# Altium PCB Industrial_IOT_Dev_Brd-v1.0.PcbDoc (part 7 of 8)
Units mil, origin at the board's own origin, x right, y up, seen from the top; angles counter-clockwise.
Board outline 6299.21 x 4724.41 mil, 4 copper layers (Top Layer, Layer 1, Layer 2, Bottom Layer), stack 62.047 mil thick; 376 components, 240 nets, 1129 pads, 635 vias.
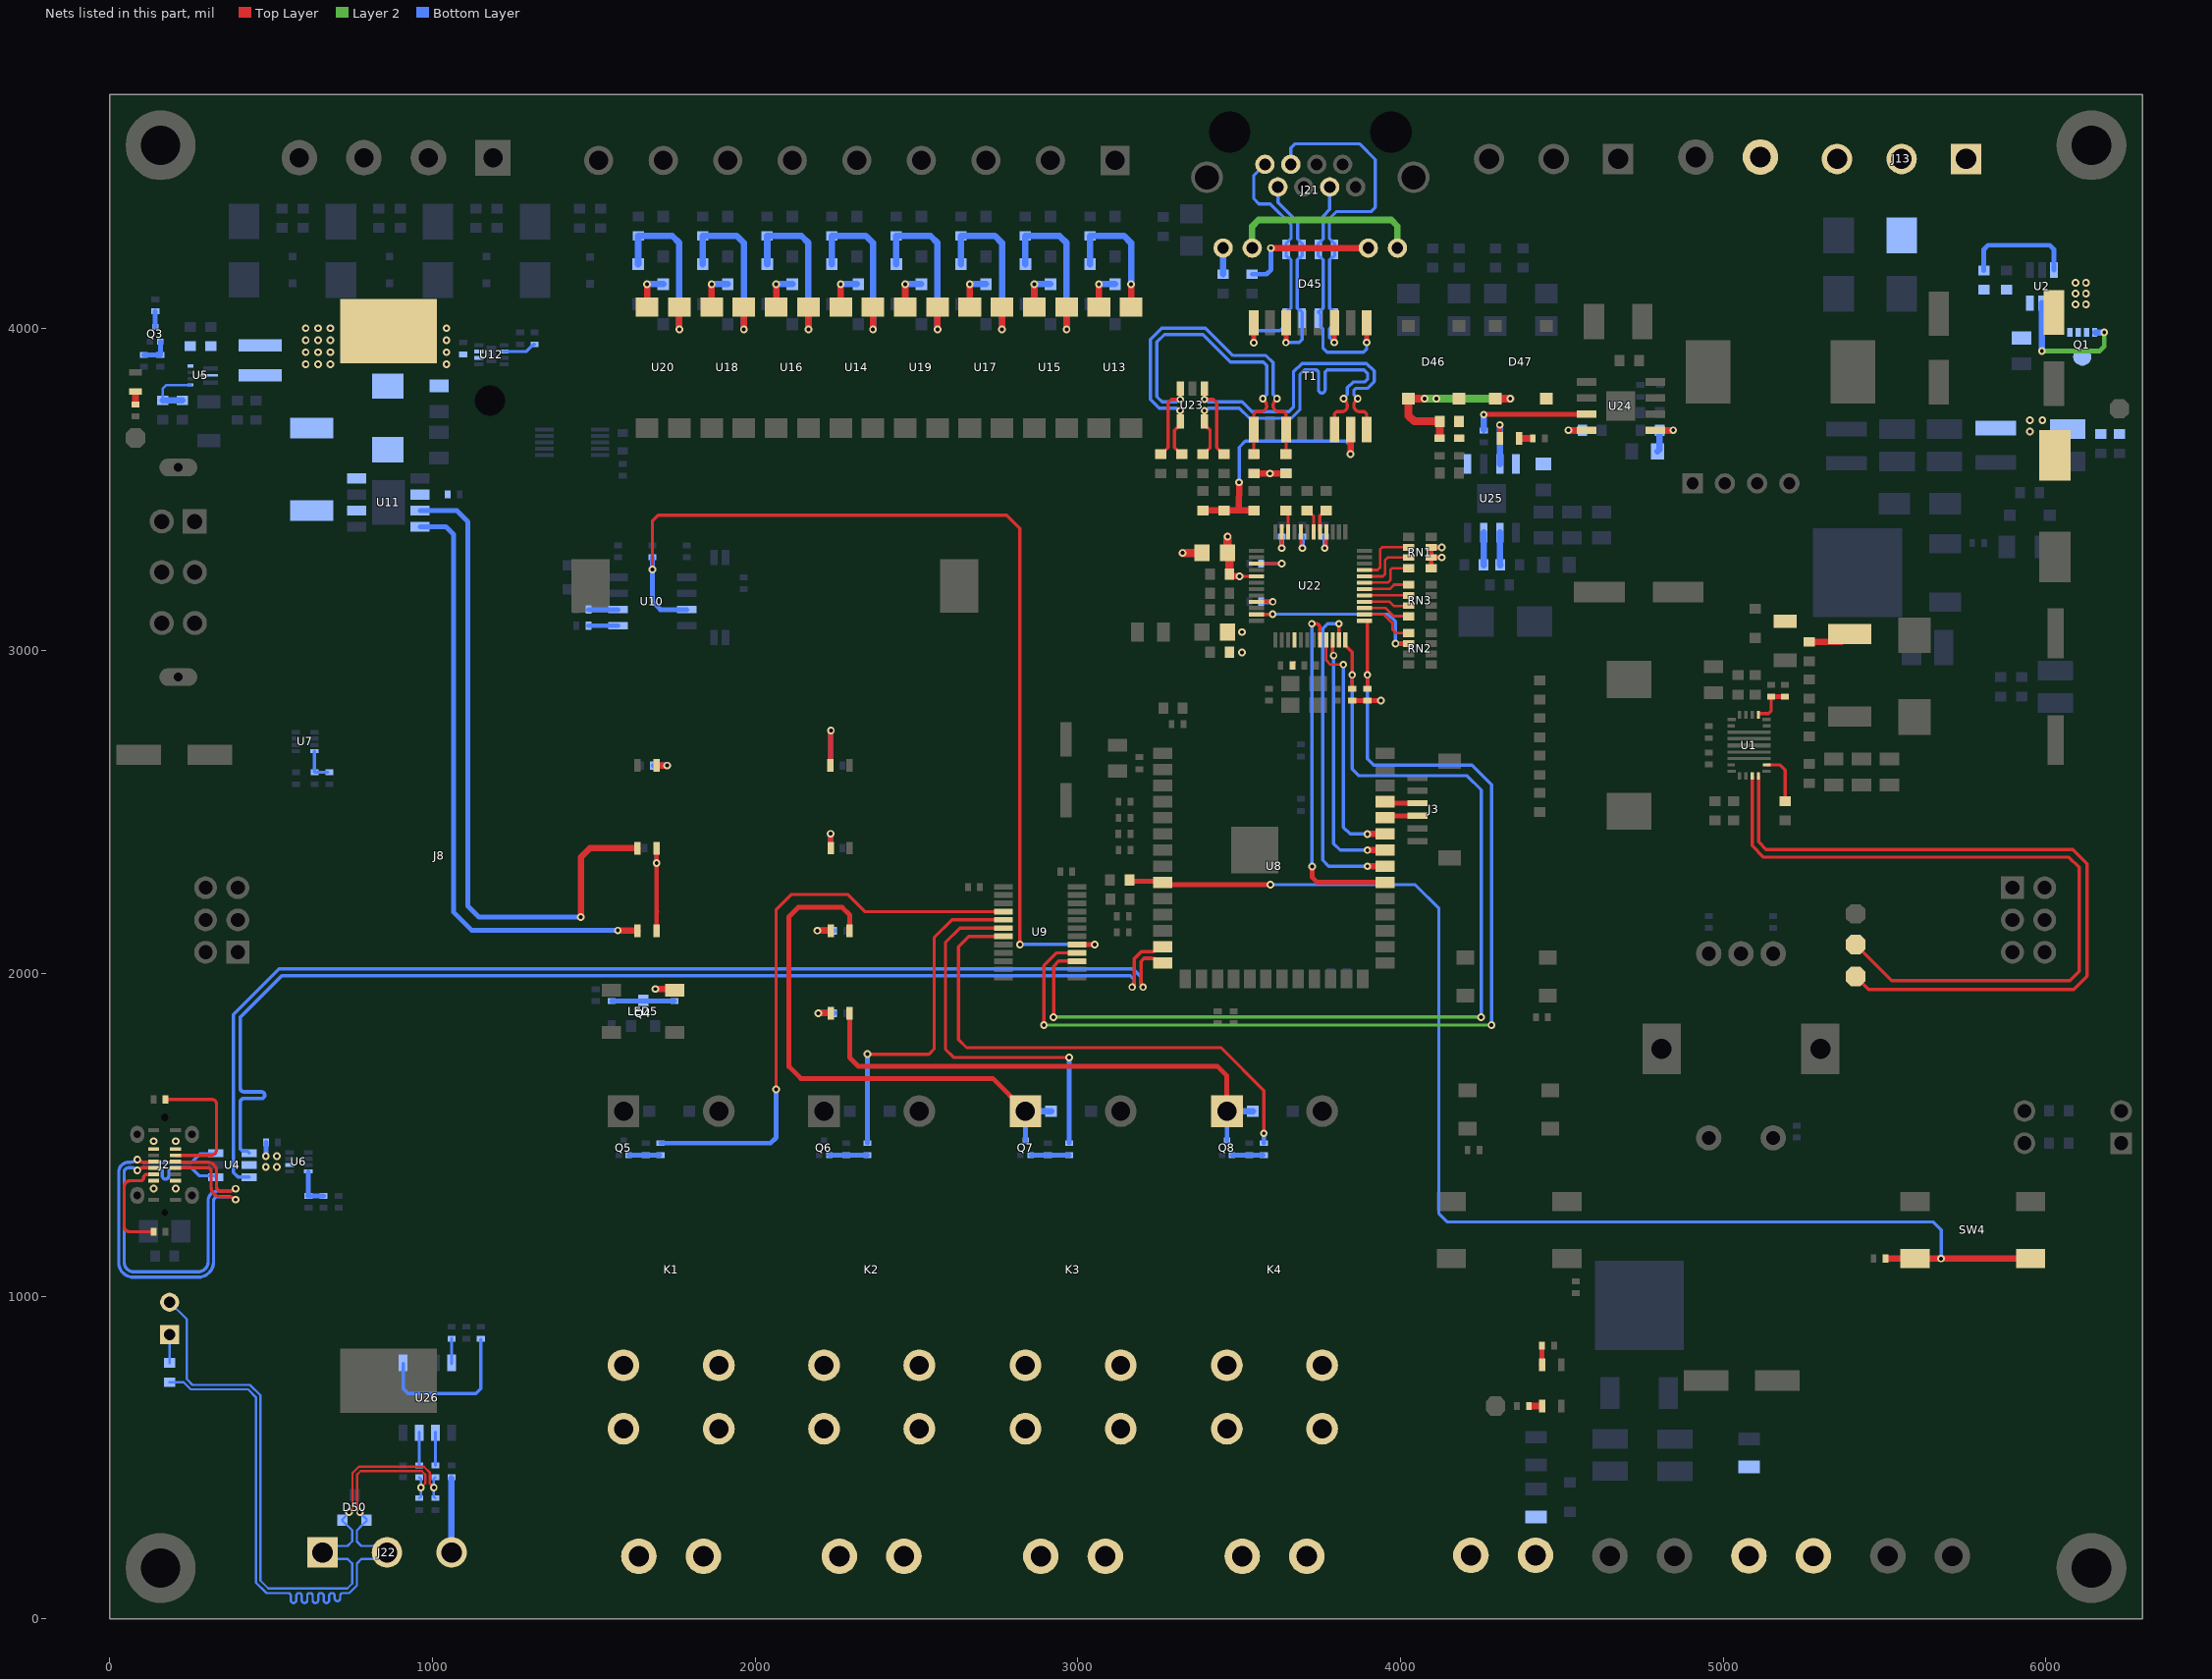
[diagram p6: the nets of this part, all layers, seen from the top]

## Via types
v1: diameter 23.62, hole 11.81, Top Layer to Bottom Layer, tented both sides, 635 vias

## Nets (pads, with @x,y where several pads share a name; then routed paths per layer and width w, separated by ;. In a path a pad name is that pad's centre, name@x,y a point inside that pad or via, vN(x,y) a via of type N, cw(c..) or ccw(c..) an arc to the next point about the centre after c; other vN are vias at no path point) (continued)
NetD11_1: D11.1 K3.1 LED10.2 Q7.3 | length 1684.7
  Top Layer w15: LED10.2@2293.24,2132.79 2293.24,2181.76 2270,2205 2133.43,2205 2104.97,2176.54 2104.97,1711.54 2141.5,1675 2736.41,1675 K3.1@2837.79,1573.63
  Bottom Layer w15: Q7.3@2838.23,1482.53 K3.1@2838.23,1573.19
  Bottom Layer w20: K3.1@2837.79,1573.63 D11.1@2918.23,1573.63
NetD12_1: D12.1 K4.1 LED11.2 Q8.3 | length 1610.2
  Top Layer w15: LED11.2@2293.24,1876.89 2293.24,1739.52 2320.53,1712.23 3433.04,1712.23 3461.93,1683.33 K4.1@3461.93,1573.63
  Bottom Layer w15: Q8.3@3462.38,1482.53 K4.1@3462.38,1573.18
  Bottom Layer w20: K4.1@3461.93,1573.63 D12.1@3542.38,1573.62
NetD13_1: D13.1 U13.2 | length 121
  Top Layer w20: U13.2@3065.31,4065.14 v1(3065.31,4136.09)
  Bottom Layer w20: v1(3065.31,4136.09) D13.1@3115.31,4136.09
NetD14_1: D14.1 U14.2 | length 121
  Top Layer w20: U14.2@2265.31,4065.13 v1(2265.31,4136.09)
  Bottom Layer w20: v1(2265.31,4136.09) D14.1@2315.31,4136.09
NetD16_2: D16.2 R66.2 U13.1 | length 422.5
  Top Layer w20: U13.1@3165.31,4065.14 v1(3165.31,4136.09)
  Bottom Layer w20: D16.2@3037.73,4198.1 R66.2@3037.73,4285.54 3143.33,4285.54 3165.31,4263.56 v1(3165.31,4136.09)
NetD18_2: D18.2 R67.2 U14.1 | length 560.7
  Top Layer w20: v1(2365.31,3996.04) U14.1@2365.31,4065.13
  Bottom Layer w20: D18.2@2237.73,4198.1 R67.2@2237.73,4285.54 2343.33,4285.54 2365.31,4263.56 v1(2365.31,3996.04)
NetD19_1: D19.1 U15.2 | length 121
  Top Layer w20: U15.2@2865.31,4065.14 v1(2865.31,4136.09)
  Bottom Layer w20: v1(2865.31,4136.09) D19.1@2915.31,4136.09
NetD20_1: D20.1 U16.2 | length 121
  Top Layer w20: U16.2@2065.31,4065.13 v1(2065.31,4136.09)
  Bottom Layer w20: v1(2065.31,4136.09) D20.1@2115.31,4136.09
NetD22_2: D22.2 R70.2 U15.1 | length 560.7
  Top Layer w20: v1(2965.31,3996.04) U15.1@2965.31,4065.14
  Bottom Layer w20: D22.2@2837.73,4198.1 R70.2@2837.73,4285.54 2943.33,4285.54 2965.31,4263.56 v1(2965.31,3996.04)
NetD24_2: D24.2 R71.2 U16.1 | length 560.7
  Top Layer w20: v1(2165.31,3996.04) U16.1@2165.31,4065.13
  Bottom Layer w20: D24.2@2037.73,4198.1 R71.2@2037.73,4285.54 2143.33,4285.54 2165.31,4263.56 v1(2165.31,3996.04)
NetD25_1: D25.1 U17.2 | length 121
  Top Layer w20: U17.2@2665.31,4065.14 v1(2665.31,4136.09)
  Bottom Layer w20: v1(2665.31,4136.09) D25.1@2715.31,4136.09
NetD26_1: D26.1 U18.2 | length 121
  Top Layer w20: U18.2@1865.31,4065.13 v1(1865.31,4136.09)
  Bottom Layer w20: v1(1865.31,4136.09) D26.1@1915.31,4136.09
NetD28_2: D28.2 R74.2 U17.1 | length 560.7
  Top Layer w20: v1(2765.31,3996.04) U17.1@2765.31,4065.14
  Bottom Layer w20: D28.2@2637.73,4198.1 R74.2@2637.73,4285.54 2743.33,4285.54 2765.31,4263.56 v1(2765.31,3996.04)
NetD30_2: D30.2 R75.2 U18.1 | length 560.7
  Top Layer w20: v1(1965.31,3996.04) U18.1@1965.31,4065.13
  Bottom Layer w20: D30.2@1837.73,4198.1 R75.2@1837.73,4285.54 1943.33,4285.54 1965.31,4263.56 v1(1965.31,3996.04)
NetD31_1: D31.1 U19.2 | length 121
  Top Layer w20: U19.2@2465.31,4065.14 v1(2465.31,4136.09)
  Bottom Layer w20: v1(2465.31,4136.09) D31.1@2515.31,4136.09
NetD32_1: D32.1 U20.2 | length 121
  Top Layer w20: U20.2@1665.31,4065.13 v1(1665.31,4136.09)
  Bottom Layer w20: v1(1665.31,4136.09) D32.1@1715.31,4136.09
NetD34_2: D34.2 R78.2 U19.1 | length 560.7
  Top Layer w20: v1(2565.31,3996.04) U19.1@2565.31,4065.14
  Bottom Layer w20: D34.2@2437.73,4198.1 R78.2@2437.73,4285.54 2543.33,4285.54 2565.31,4263.56 v1(2565.31,3996.04)
NetD36_2: D36.2 R79.2 U20.1 | length 560.7
  Top Layer w20: v1(1765.31,3996.04) U20.1@1765.31,4065.13
  Bottom Layer w20: D36.2@1637.73,4198.1 R79.2@1637.73,4285.54 1743.33,4285.54 1765.31,4263.56 v1(1765.31,3996.04)
NetD45_1: D45.1 D45.8 J21.1 T1.16 | length 804.8
  Top Layer w10: v1(3545,3955) v1@3545.2,3955.2 ; T1.16@3545.2,4016.14 T1.16@3545.4,4016.34
  Top Layer w15: v1@3545.2,3955.2 T1.16@3545.2,4016.14
  Bottom Layer w10: v1(3545,3955) 3545,3986.19 3550.86,3992.05 3626.13,3992.05 3638.59,4004.52 3638.59,4023.78 D45.8@3645.4,4030.59 3645.4,4049.29 3652.21,4056.1 3655.01,4056.1 3660.86,4061.96 3660.86,4211.82 3655.01,4217.68 3652.21,4217.68 3645.4,4224.49 3645.4,4261.89 3660.93,4277.42 3660.93,4319.93 3596.71,4384.14 3561.7,4384.14 3545.26,4400.58 3545.26,4472.79 J21.1@3579.86,4507.39
NetD45_2: D45.2 D45.7 J21.2 T1.14 | length 635.7
  Top Layer w10: v1(3645,3955.2) v1@3645.2,3955.4 ; T1.14@3645.2,4016.14 T1.14@3645.4,4016.34
  Top Layer w15: v1@3645.2,3955.4 T1.14@3645.2,4016.14
  Bottom Layer w10: J21.2@3620.02,4437.31 3620.73,4436.59 3620.73,4388.51 3681.06,4328.19 3681.06,4276.24 3695.4,4261.89 3695.4,4224.49 3688.59,4217.68 3685.85,4217.68 3679.99,4211.82 3679.99,4061.96 3685.85,4056.1 3688.59,4056.1 3695.4,4049.29 3695.4,3964.27 3686.34,3955.2 v1(3645,3955.2)
NetD45_3: D45.3 D45.6 J21.6 T1.9 | length 762.9
  Top Layer w15: v1@3895.2,3955.81 T1.9@3895.2,4016.14
  Top Layer w20: v1(3895,3955.61) v1@3895.2,3955.81 ; T1.9@3895.2,4016.14 T1.9@3895.4,4016.34
  Bottom Layer w10: J21.6@3780.65,4437.31 3780.64,4367.64 3760.2,4347.19 3760.2,4276.68 3745.4,4261.89 3745.4,4224.49 3752.21,4217.68 3755.01,4217.68 3760.86,4211.82 3760.86,4061.96 3755.01,4056.1 3752.21,4056.1 3745.4,4049.29 3752.21,4042.48 3752.21,4004.83 3759.96,3997.09 3759.96,3937.16 3772.12,3925 3885.61,3925 3895,3934.39 v1(3895,3955.61)
NetD45_4: D45.4 D45.5 J21.3 T1.11 | length 1141.5
  Top Layer w10: v1(3795,3955.4) v1@3795.2,3955.61 ; T1.11@3795.2,4016.14 T1.11@3795.4,4016.34
  Top Layer w15: v1@3795.2,3955.61 T1.11@3795.2,4016.14
  Bottom Layer w10: J21.3@3660.16,4507.39 3660.16,4557.94 3673.33,4571.11 3872.65,4571.11 3921.54,4522.22 3921.54,4374.54 3907.83,4360.84 3800.83,4360.84 3779.59,4339.6 3779.59,4277.7 D45.4@3795.4,4261.89 ; v1(3795,3955.4) 3780.13,3970.27 3780.13,3997.85 3787.35,4005.08 3788.59,4005.08 3795.4,4011.89 3795.4,4049.29 3788.59,4056.1 3785.85,4056.1 3779.99,4061.96 3779.99,4211.82 3785.85,4217.68 3788.59,4217.68 3795.4,4224.49 D45.4@3795.4,4261.89 ; D45.4@3795.4,4243.19 D45.4@3795.4,4261.89
NetF2_1: F2.1 R2.2 R130.2 | length 100.5
  Top Layer w20: R130.2@5266.72,3027.7 R2.2@5367.18,3027.7
NetF5_2: F5.2 J15.1 J15.2
NetF6_2: F6.2 J16.1 J16.2
NetJ21_10: J21.10 R88.2 | length 432.8
  Top Layer w20: v1(3598.8,4247.94) J21.10@3900.32,4247.94
  Bottom Layer w15: R88.2@3540.49,4166.89 3585.03,4166.89 3598.8,4180.66 v1(3598.8,4247.94)
NetJ21_12: J21.12 R101.2 | length 81
  Bottom Layer w20: R101.2@3450.32,4166.89 J21.12@3450.32,4247.94
NetJ22_3: J22.3 R121.2 | length 229.2
  Bottom Layer w20: J22.3@1059.46,206.2 R121.2@1059.46,435.44
NetJ23_1: J23.1 R122.1 | length 88.2
  Bottom Layer w8: R122.1@185.76,793.45 J23.1@185.76,881.62
NetL2_2: L2.2 U5.2
NetL3_1: L3.1 U11.8
NetLED1_1: LED1.1 R7.2 | length 73.7
  Top Layer w20: LED1.1@1694.59,2644.45 v1(1727.43,2644.45)
  Bottom Layer w20: R7.2@1687.99,2644.45 v1@1728.9,2644.45
NetLED2_1: LED2.1 R8.2 | length 59.6
  Top Layer w15: LED2.1@4438.66,787.4 R8.2@4438.66,847
NetLED3_1: LED3.1 R12.2 | length 33.7
  Top Layer w20: R12.2@4402.55,659.96 LED3.1@4436.26,659.96
NetLED4_1: LED4.1 R27.2 | length 33.7
  Top Layer w20: R27.2@80,3767.71 LED4.1@80,3801.42
NetLED5_4: LED5.4 R38.2 | length 124.3
  Top Layer w8: LED5.4@1741.32,1952 LED5.4@1751.59,1941.73
  Top Layer w20: v1(1690.76,1952) LED5.4@1741.32,1952
  Bottom Layer w15: v1(1690.76,1952) R38.2@1750,1952
NetLED6_1: LED6.1 LED7.1 R47.2 | length 302.4
  Top Layer w15: LED6.1@1694.7,2388.54 v1(1694.7,2342.52) LED7.1@1694.68,2132.66 LED7.1@1694.85,2132.49 ; 1694.85,2192.34 1695.02,2192.17
  Bottom Layer w15: v1(1694.7,2342.52) R47.2@1694.7,2388.54
NetLED6_2: LED6.2 U11.3 | length 2088.3
  Top Layer w20: v1(1460,2175) 1460,2360 1488.56,2388.56 LED6.2@1634.55,2388.56
  Bottom Layer w15: U11.3@962.22,3434.41 1075.79,3434.41 1110,3400.2 1110,2209.54 1144.54,2175 v1(1460,2175)
NetLED7_2: LED7.2 U11.4 | length 1876.6
  Top Layer w20: v1(1574.73,2133.39) LED7.2@1634.91,2133.39
  Bottom Layer w15: U11.4@962.22,3384.41 1041.88,3384.41 1066.29,3360 1066.29,2189.36 1122.27,2133.39 v1(1574.73,2133.39)
NetLED8_1: LED8.1 R60.1 | length 217.7
  Top Layer w15: LED8.1@2233.97,2644.57 2234.48,2645.09 2234.48,2752.48 v1(2235,2753)
  Bottom Layer w15: R60.1@2233.98,2644.58 2234.49,2645.09 2234.49,2752.49 v1(2235,2753)
NetLED9_1: LED9.1 R61.1 | length 88.3
  Top Layer w15: LED9.1@2234.09,2388.77 v1@2234.09,2432.91
  Top Layer w20: v1(2234,2433) v1@2234.09,2432.91
  Bottom Layer w15: R61.1@2234,2389 v1(2234,2433)
NetLED10_1: LED10.1 R62.1 | length 89.7
  Top Layer w15: LED10.1@2230.14,2131.4 2232.8,2131.4 LED10.1@2234.18,2132.79
  Top Layer w20: v1(2193,2132.79) 2228.75,2132.79 LED10.1@2230.14,2131.4
  Bottom Layer w20: v1(2193,2132.79) R62.1@2240.41,2132.79
NetLED11_1: LED11.1 R63.1 | length 84.9
  Top Layer w15: v1(2196,1877) v1@2196.05,1876.95 ; LED11.1@2229.32,1876.89 LED11.1@2234.18,1876.89
  Top Layer w20: v1@2196.05,1876.95 2229.27,1876.95 LED11.1@2229.32,1876.89
  Bottom Layer w20: v1(2196,1877) 2196.05,1876.95 R63.1@2242.68,1876.95
NetLED12_1: LED12.1 R124.2 | length 39
  Top Layer w20: LED12.1@4367.06,3658.19 R124.2@4406.08,3658.19
NetQ1_4: Q1.4 U2.5 | length 416.8
  Layer 2 w15: v1(5987.73,3929.13) 6166.83,3929.13 6180.72,3943.02 v1(6180.72,3986.53)
  Bottom Layer w20: v1(5987.73,3929.13) U2.5@5987.73,4076.95 ; Q1.4@6154.03,3986.53 v1(6180.72,3986.53)
NetQ3_1: Q3.1 R23.2 R26.2 | length 92.4
  Bottom Layer w15: R26.2@105.6,3917.25 R23.2@157.06,3917.25 Q3.1@157.06,3958.2
NetQ3_3: Q3.3 R19.1 | length 48
  Bottom Layer w15: Q3.3@141.31,4003.47 R19.1@141.31,4051.5
NetQ4_3: Q4.3 R37.1 R38.1 | length 194.3
  Bottom Layer w15: R37.1@1555.74,1915 R38.1@1750,1915
NetQ5_1: Q5.1 R52.2 R56.2 | length 96.2
  Bottom Layer w15: Q5.1@1608.48,1437.25 R52.2@1704.71,1437.26
NetQ6_1: Q6.1 R53.2 R57.2 | length 118.4
  Bottom Layer w15: Q6.1@2229.83,1437.25 R53.2@2348.2,1437.26
NetQ7_1: Q7.1 R54.2 R58.2 | length 119.4
  Bottom Layer w15: Q7.1@2853.98,1437.25 R54.2@2973.35,1437.26
NetQ8_1: Q8.1 R55.2 R59.2 | length 96.2
  Bottom Layer w15: Q8.1@3478.13,1437.25 R55.2@3574.36,1437.25
NetR3_1: R3.1 R5.2 U1.14 | length 129.2
  Top Layer w10: U1.14@5110,2805.12 5139.96,2805.12 5148.95,2814.11 R5.2@5148.95,2857.95
  Top Layer w15: R5.2@5148.95,2857.95 R3.1@5191.66,2857.95
NetR6_2: R6.2 U2.3 | length 357
  Bottom Layer w15: R6.2@5807.73,4178.53 5807.73,4243.97 5820.5,4256.74 6011.91,4256.74 6025.13,4243.52 U2.3@6025.13,4180.1
NetR15_1: R15.1 R20.2 U5.4 | length 187.7
  Bottom Layer w8: R20.2@164.9,3776 164.9,3812.84 175.64,3823.58 U5.4@250.28,3823.58
  Bottom Layer w20: R20.2@164.9,3776 R15.1@225.9,3776
NetR17_1: R17.1 R21.2 U6.4 | length 123.7
  Bottom Layer w15: R17.1@613.84,1311 ccw(c613.84,1312.44) R17.1@615.28,1312.44 ; U6.4@615.28,1384.84 615.28,1310.99 R17.1@616.19,1310.99 R21.2@662.91,1310.99
NetR18_1: R18.1 R22.2 U7.4 | length 106.1
  Bottom Layer w10: U7.4@634.87,2688.61 R22.2@634.87,2623.44 R18.1@675.81,2623.44
NetR44_1: R44.1 U10.6 | length 91.9
  Bottom Layer w15: R44.1@1483.45,3127.86 U10.6@1575.39,3127.86
NetR45_1: R45.1 U10.5 | length 91.9
  Bottom Layer w15: R45.1@1483.45,3077.86 U10.5@1575.39,3077.86
NetR48_1: R48.1 U11.6
NetR49_2: R49.2 U11.2
NetR51_2: R51.2 U12.6 | length 104
  Bottom Layer w10: U12.6@1222,3927.66 1291.66,3927.66 1313.5,3949.5 R51.2@1317,3949.5
NetR90_2: R90.2 U22.5 | length 75.9
  Top Layer w10: U22.5@3750.33,3368.6 3750.33,3418.24 3767.11,3435.01 R90.2@3769.61,3435.01
NetR91_2: R91.2 U22.6 | length 76
  Top Layer w10: R91.2@3710.96,3435 3713.46,3435 3730.65,3417.82 U22.6@3730.65,3368.6
NetR103_2: R103.2 U22.10 | length 69
  Top Layer w10: R103.2@3645.61,3435.01 3651.91,3428.71 U22.10@3651.91,3368.6
NetR107_2: R107.2 U24.3 | length 365.7
  Top Layer w10: v1(4258,3732) v1@4258.72,3732.72 ; U24.3@4575.71,3732.72 U24.3@4576.43,3733.44
  Top Layer w15: v1@4258.72,3732.72 U24.3@4575.71,3732.72
  Bottom Layer w20: R107.2@4257.96,3685.3 v1(4258,3732) v1(4258,3732)
NetR108_1: R108.1 U25.2 | length 100.8
  Bottom Layer w20: U25.2@4307.92,3366.07 4308.46,3365.53 4308.46,3266.28 R108.1@4309,3265.74
NetR109_1: R109.1 R114.2 U24.5 | length 166.9
  Top Layer w20: U24.5@4789.03,3683.44 v1@4845.1,3683.44
  Bottom Layer w20: R109.1@4796.6,3617.53 4803.1,3624.03 R114.2@4803.1,3683.44 4803.17,3683.51 4845.17,3683.51 v1(4845.24,3683.57)
NetR111_2: R111.2 U25.3 | length 100.4
  Bottom Layer w20: R111.2@4257.73,3265.75 4257.82,3265.84 4257.82,3365.97 U25.3@4257.92,3366.07
NetR112_1: R112.1 U25.5 U25.8
NetR113_2: R113.2 U24.4 | length 99.5
  Top Layer w20: v1@4520.35,3683.44 U24.4@4576.43,3683.44
  Bottom Layer w20: v1(4520.22,3683.57) 4520.28,3683.51 4563.54,3683.51 R113.2@4563.61,3683.44
NetR115_2: R115.2 U26.1 | length 483
  Bottom Layer w10: U26.1@909.46,791.43 909.46,713.52 924.44,698.54 1134.65,698.54 1150,713.89 R115.2@1150,865.92
NetR116_1: R116.1 U26.7 | length 102.7
  Bottom Layer w10: R116.1@959.46,476.09 U26.7@959.46,578.83
NetR118_1: R118.1 U26.6 | length 102.7
  Bottom Layer w10: R118.1@1009.46,476.09 U26.6@1009.46,578.83
NetR119_2: R119.2 U26.4 | length 77.2
  Bottom Layer w10: U26.4@1059.46,791.43 R119.2@1059.46,868.63
NetR126_2: R126.2 U1.6 | length 159.9
  Top Layer w10: U1.6@5135.01,2646.33 5176.32,2646.33 5191.66,2630.99 R126.2@5191.66,2534.1
NetRN1_6: RN1.6 U22.45 | length 199
  Top Layer w8: U22.45@3888.13,3250.49 3929.08,3250.49 3936.79,3258.2 3936.79,3313.64 3943.83,3320.67 RN1.6@4025.57,3320.67
NetRN1_7: RN1.7 U22.44 | length 186.8
  Top Layer w8: U22.44@3888.13,3230.8 3944.71,3230.8 3952.78,3238.87 3952.78,3281.81 3960.14,3289.17 RN1.7@4025.57,3289.17
NetRN1_8: RN1.8 U22.43 | length 174
  Top Layer w8: U22.43@3888.13,3211.12 3960.34,3211.12 3968.42,3219.19 3968.42,3249.72 3974.8,3256.1 RN1.8@4025.57,3256.1
NetRN2_5: RN2.5 U22.38 | length 173.4
  Top Layer w8: U22.38@3888.13,3112.69 3948.81,3112.69 3974.8,3086.71 3974.8,3065.75 3985.11,3055.44 RN2.5@4025.57,3055.44
NetRN2_6: RN2.6 U22.23 | length 550.3
  Top Layer w10: U22.23@3553.48,3112.69 3553.84,3113.05 3603.58,3113.05 v1(3603.94,3113.41)
  Top Layer w15: v1(3984.37,3022.37) RN2.6@4025.57,3022.37
  Bottom Layer w10: v1(3603.94,3113.41) 3961.96,3113.41 3984.37,3091 v1(3984.37,3022.37)
NetRN3_5: RN3.5 U22.42 | length 143
  Top Layer w8: U22.42@3888.13,3191.43 3966.39,3191.43 3979.87,3204.91 RN3.5@4025.57,3204.91
NetRN3_6: RN3.6 U22.41 | length 137.5
  Top Layer w8: U22.41@3888.13,3171.75 4025.48,3171.75 RN3.6@4025.57,3171.84
NetRN3_7: RN3.7 U22.40 | length 143
  Top Layer w8: U22.40@3888.13,3152.06 3966.39,3152.06 3979.87,3138.59 RN3.7@4025.57,3138.59
NetRN3_8: RN3.8 U22.39 | length 147.8
  Top Layer w8: U22.39@3888.13,3132.38 3954.08,3132.38 3979.19,3107.27 RN3.8@4025.57,3107.27
NetTP5_1: TP5.1 U1.3 | length 2331
  Top Layer w10: U1.3@5089.73,2612.47 5089.73,2395.69 5125.03,2360.4 6071.45,2360.4 6102.91,2328.93 6102.91,2006.73 6074.23,1978.05 5521.92,1978.05 5473.64,2026.33 TP5.1@5410,2089.96
NetTP6_1: TP6.1 U1.4 | length 2351.1
  Top Layer w10: U1.4@5109.42,2612.47 5109.42,2407.97 5132.99,2384.4 6084.06,2384.4 6127.92,2340.55 6127.92,1992.18 6086.45,1950.71 5450.25,1950.71 TP6.1@5410,1990.96
RCT: C58.2 R93.1 R94.1 T1.7 | length 809.5
  Top Layer w20: R93.1@3392.4,3435 3499.11,3435 ; v1(3500,3521.86) 3499.11,3435 ; C58.2@3545.4,3435 3499.11,3435 ; v1@3845.27,3609.81 T1.7@3845.27,3685.49
  Bottom Layer w10: v1(3500,3521.86) 3500,3630.74 3519.26,3650 3830.57,3650 3845.27,3635.31 3845.27,3609.81 v1(3845.13,3609.67)
RD_N: C55.1 T1.8 U23.1 | length 1149.4
  Top Layer w10: v1(3392.4,3779.1) 3420.25,3779.09 3430.01,3769.33 3430.01,3629.52 3440.06,3619.47 3442.64,3619.47 C55.1@3452.64,3609.47 ; v1(3867.21,3781.06) 3862.47,3776.31 ccw(c3879.52,3759.26) 3855.4,3759.26 ccw(c3873.48,3759.26) 3873.48,3741.19 3884.13,3741.19 cw(c3884.13,3730.17) 3895.15,3730.17 T1.8@3895.15,3690.8
  Bottom Layer w10: v1(3392.4,3779.1) 3396.09,3779.1 3403.59,3771.6 3508.95,3771.6 3539.89,3740.66 3654.14,3740.66 3668.29,3754.8 3668.29,3864.29 3694.45,3890.45 3895.05,3890.45 3918.37,3867.13 3918.37,3834.54 3896.85,3813.02 3861.26,3813.02 3855.4,3807.16 3855.4,3793.73 3867.21,3781.92 v1(3867.21,3781.06)
RD_P: C56.1 T1.6 U23.5 | length 1149.8
  Top Layer w10: C56.1@3387.39,3609.47 3389.89,3609.47 3399.89,3619.47 3399.89,3619.6 3410.01,3629.73 3410.01,3682.86 3392.38,3700.5 U23.5@3392.4,3710.35 ; T1.6@3795.4,3691.12 3795.4,3730.49 cw(c3806.1,3730.49) 3806.1,3741.19 3818.47,3741.19 ccw(c3818.47,3758.12) 3835.4,3758.12 ccw(c3808.53,3758.12) 3827.53,3777.12 v1(3823.59,3781.06)
  Bottom Layer w10: v1(3392.4,3744.1) 3396.09,3744.1 3403.59,3751.6 3500.66,3751.6 3531.6,3720.66 3662.43,3720.66 3688.29,3746.52 3688.29,3856.01 3702.73,3870.45 3711.21,3870.45 3736.22,3870.45 cw(c3736.22,3860.45) 3746.22,3860.45 3746.22,3808.65 ccw(c3756.22,3808.65) 3766.22,3808.65 3766.22,3860.45 cw(c3776.22,3860.45) 3776.22,3870.45 3829.83,3870.45 3886.76,3870.45 3898.37,3858.85 3898.37,3842.83 3888.56,3833.02 3852.98,3833.02 3835.4,3815.45 3835.4,3793.73 3823.59,3781.92 v1(3823.59,3781.06)
RELAY_1: R52.1 U9.4 | length 1816.9
  Top Layer w10: v1(2065,1641.37) 2065,2196.76 2113.24,2245 2286.38,2245 2339.4,2191.98 U9.4@2769.38,2191.98
  Bottom Layer w15: R52.1@1706.85,1474.39 2048,1474.39 2065,1491.39 v1(2065,1641.37)
RELAY_2: R53.1 U9.5 | length 1072.9
  Top Layer w10: v1(2348.2,1750.5) 2349.35,1750.5 2349.85,1750 2538.43,1750 2555,1766.57 2555,2111.35 2610.04,2166.39 U9.5@2769.38,2166.39
  Bottom Layer w15: R53.1@2348.2,1474.39 2348.2,1745.87 2350.5,1748.16 v1@2350.5,1750.5
RELAY_3: R54.1 U9.6 | length 1188.2
  Top Layer w10: U9.6@2769.38,2140.8 2634.45,2140.8 2590,2096.35 2590,1765.46 2615.46,1740 v1(2973.35,1740)
  Bottom Layer w15: R54.1@2973.35,1474.4 v1(2973.35,1740)
RELAY_4: R55.1 U9.7 | length 1615.7
  Top Layer w10: U9.7@2769.38,2115.21 2661.73,2115.21 2630,2083.48 2630,1795.74 2655.4,1770.34 3444.07,1770.34 3576.5,1637.92 v1(3576.5,1505)
  Bottom Layer w15: R55.1@3576.5,1474.39 v1(3576.5,1505)
RLY1_COM: J9.2 K1.4 K1.5
RLY1_NO: J9.1 K1.3 K1.6
RLY2_COM: J10.2 K2.4 K2.5
RLY2_NO: J10.1 K2.3 K2.6
RLY3_COM: J11.2 K3.4 K3.5
RLY3_NO: J11.1 K3.3 K3.6
RLY4_COM: J12.2 K4.4 K4.5
RLY4_NO: J12.1 K4.3 K4.6
RS485_N: D50.1 J22.2 R116.2 R120.2 R122.2 | length 2256.8
  Top Layer w7: v1(775.59,330.96) 775.59,334.2 766.42,343.37 766.42,446.6 777.77,457.95 967.67,457.95 978.34,447.28 978.34,420.57 967.95,410.18 v1@962.64,410.18
  Bottom Layer w7: R122.2@185.76,733.45 228.84,733.45 250.88,711.41 428.8,711.41 453,687.2 453,113.27 485.75,80.52 532.22,80.52 552.72,80.52 cw(c552.72,72.02) 561.22,72.02 561.22,57.98 ccw(c569.72,57.98) 578.22,57.98 578.22,72.02 cw(c586.72,72.02) 595.22,72.02 595.22,57.98 ccw(c603.72,57.98) 612.22,57.98 612.22,72.02 cw(c620.72,72.02) 629.22,72.02 629.22,57.98 ccw(c637.72,57.98) 646.22,57.98 646.22,72.02 cw(c654.72,72.02) 663.22,72.02 663.22,57.98 ccw(c671.72,57.98) 680.22,57.98 680.22,72.02 cw(c688.72,72.02) 697.22,72.02 697.22,63.85 ccw(c705.72,63.85) 714.22,63.85 714.22,72.02 cw(c722.72,72.02) 722.72,80.52 737.14,80.52 742.19,80.52 765.81,104.14 765.81,171.94 780.07,186.2 J22.2@859.46,186.2 ; v1(775.59,330.96) 775.59,328.8 796.22,308.17 D50.1@796.22,306.2 796.22,304.23 783.57,291.59 783.11,291.59 765.87,274.35 765.87,240.4 780.07,226.2 J22.2@859.46,226.2 ; R120.2@959.46,374.5 964.46,379.5 v1(964.46,407) 964.46,434.09 R116.2@959.46,439.09
RS485_P: D50.2 J22.1 J23.2 R117.2 R118.2 | length 2256.9
  Top Layer w7: v1(741.97,330.96) 741.97,332.92 752.42,343.37 752.42,452.39 771.97,471.95 973.47,471.95 992.34,453.08 992.34,419.41 1004.46,407.3 v1(1004.46,407)
  Bottom Layer w7: J23.2@185.76,981.62 238.66,928.72 238.66,743.43 256.68,725.41 434.59,725.41 467,693 467,119.06 491.55,94.52 736.39,94.52 751.81,109.94 751.81,171.94 737.55,186.2 J22.1@659.46,186.2 ; J22.1@659.46,226.2 737.55,226.2 751.87,240.52 751.87,274.86 735.14,291.59 734.05,291.59 721.41,304.23 D50.2@721.41,306.2 721.41,308.17 741.97,328.73 v1(741.97,330.96) ; R117.2@1009.46,374.5 1004.46,379.5 v1(1004.46,407) 1004.46,434.09 R118.2@1009.46,439.09
RTC_INT: R46.1 U9.17 U10.3 | length 3144
  Top Layer w10: v1(1681.69,3251.86) 1681.69,3401.69 1700,3420 2780,3420 2820.72,3379.28 v1(2820.72,2089.62)
  Top Layer w15: U9.17@2997.73,2089.62 v1(3052.58,2089.62)
  Bottom Layer w10: v1@2820.72,2091.18 2821.5,2090.4 3051.8,2090.4 v1(3052.58,2089.62)
  Bottom Layer w15: R46.1@1681.69,3289.86 1681.69,3152.86 1706.69,3127.86 U10.3@1787.99,3127.86
RXD0: J3.4 U8.36 | length 103
  Top Layer w15: U8.36@3958.07,2488.33 J3.4@4052.86,2488.33
  Top Layer w20: U8.36@3952.27,2482.53 U8.36@3958.07,2488.33
SEL_BUT: C35.2 R35.1 SW4.3 SW4.4 U8.9 | length 4061.7
  Top Layer w15: R35.1@3157.06,2289.53 3160.56,2286.03 3259.79,2286.03 U8.9@3263.29,2282.53 U8.9@3269.17,2276.65 ; U8.9@3263.29,2275.53 v1@3597.01,2275.53
  Top Layer w20: C35.2@5506.46,1116.68 SW4.3@5594.47,1116.68 v1(5675.36,1116.68) SW4.4@5952.73,1116.68
  Bottom Layer w10: v1(3597.01,2275.39) 4044.94,2275.39 4119.02,2201.31 4119.02,1255.98 4145,1230 5651.16,1230 5675.36,1205.8 v1(5675.36,1116.68)
SPI_CS: U8.32 U22.32 | length 1088.5
  Top Layer w10: v1(3725.33,3084.01) 3738.65,3084.01 cw(c3738.65,3072.33) 3750.33,3072.33 U22.32@3750.33,3033.95
  Top Layer w15: v1(3726,2332) 3726,2298.77 3742.38,2282.39 U8.32@3952.13,2282.39
  Bottom Layer w10: v1(3725.33,3084.01) 3725.67,3083.68 3725.67,2332.33 v1(3726,2332)
SPI_MISO: U8.34 U22.34 | length 800.7
  Top Layer w10: U22.34@3789.7,3033.95 3789.7,2989.32 v1@3793.83,2985.19
  Top Layer w20: v1(3897.56,2382.39) U8.34@3952.13,2382.39
  Bottom Layer w10: v1(3792.83,2985.19) 3792.83,2402.62 3813.05,2382.39 v1(3897.56,2382.39)
SPI_MOSI: U8.33 U22.35 | length 1025.7
  Top Layer w10: U22.35@3809.39,3033.95 v1(3809.39,3084.01)
  Top Layer w20: v1(3897.56,2332.39) U8.33@3952.13,2332.39
  Bottom Layer w10: v1(3809.39,3084.01) 3774.24,3084.01 3758.62,3068.38 3758.62,2351.38 3777.61,2332.39 v1(3897.56,2332.39)
SPI_SCLK: U8.35 U22.33 | length 763.9
  Top Layer w8: U22.33@3770.02,3033.95 3770.02,2970.26 3782.87,2957.41 v1(3822.77,2957.41)
  Top Layer w20: v1(3897.56,2432.39) U8.35@3952.13,2432.39
  Bottom Layer w10: v1(3822.77,2957.41) 3822.77,2453.23 3843.61,2432.39 v1(3897.56,2432.39)
T2P: LED12.2 U25.7 | length 153
  Top Layer w15: LED12.2@4308,3668.33 v1(4308,3700)
  Bottom Layer w20: U25.7@4307.92,3578.66 U25.7@4307.92,3578.66 v1(4308,3700) v1(4308,3700)
TD_N: R92.1 R99.1 T1.3 U23.4 | length 1154
  Top Layer w10: v1@3313.53,3744.1 v1(3317.22,3744.1) ; U23.4@3317.6,3710.35 3317.6,3700.51 3299.96,3682.87 3299.96,3629.73 3310.08,3619.61 3310.08,3619.48 3320.08,3609.48 R92.1@3322.58,3609.48 ; v1(3617.21,3781.06) 3612.47,3776.31 ccw(c3629.52,3759.26) 3605.4,3759.26 ccw(c3623.48,3759.26) 3623.48,3741.19 3634.13,3741.19 cw(c3634.13,3730.17) 3645.15,3730.17 T1.3@3645.15,3690.8 ; T1.3@3645.4,3685.63 3645.4,3609.67 R99.1@3645.61,3609.46
  Bottom Layer w10: 3306.03,3751.6 3252.87,3751.6 3225.29,3779.18 3225.29,3965.05 3260.19,3999.94 3396.17,3999.94 3481.11,3915 3583.28,3915 3605.4,3892.88 3605.4,3793.73 3617.21,3781.92 v1(3617.21,3781.06)
TD_P: R95.1 R97.1 T1.1 U23.3 | length 1144.8
  Top Layer w10: R95.1@3257.33,3609.48 3267.33,3619.48 3269.91,3619.48 3279.96,3629.53 3279.96,3769.34 3289.72,3779.1 v1(3317.6,3779.1) ; R97.1@3545.2,3609.67 T1.1@3545.2,3685.63 ; T1.1@3545.4,3691.12 3545.4,3730.49 cw(c3556.1,3730.49) 3556.1,3741.19 3568.47,3741.19 ccw(c3568.47,3758.12) 3585.4,3758.12 ccw(c3558.53,3758.12) 3577.53,3777.12 v1(3573.59,3781.06)
  Bottom Layer w10: 3306.41,3771.6 3261.16,3771.6 3245.29,3787.46 3245.29,3825.31 3245.29,3910 3245.29,3956.77 3268.47,3979.94 3387.88,3979.94 3472.82,3895 3575,3895 3585.4,3884.6 3585.4,3793.73 3573.59,3781.92 v1(3573.59,3781.06)
TXD0: J3.3 U8.37 | length 102.5
  Top Layer w15: U8.37@3956.78,2528.02 J3.3@4052.86,2528.02
  Top Layer w20: U8.37@3952.27,2532.53 U8.37@3956.78,2528.02
TYPEC_CC1: J2.A5 R13.1 | length 336.6
  Top Layer w10: R13.1@136.23,1200 61.01,1200 cw(c61.01,1216.01) 45,1216.01 45,1339.1 cw(c63.7,1339.1) 63.7,1357.8 95.4,1357.8 ccw(c95.4,1367.57) 105.17,1367.57 cw(c115.09,1367.57) 115.09,1377.49 J2.A5@136.23,1377.49
TYPEC_CC2: J2.B5 R14.1 | length 443.6
  Top Layer w10: R14.1@173.23,1610 316.76,1610 cw(c316.76,1595.79) 330.97,1595.79 330.97,1455.56 cw(c311.95,1455.56) 311.95,1436.54 J2.B5@204.34,1436.54
TYPEC_D_N: J2.A7 J2.B7 U4.3 | length 1542.7
  Top Layer w10: v1(85.64,1423.83) cw(c85.64,1414.93) 91.93,1421.22 93.48,1419.67 ccw(c103.51,1429.7) 103.51,1415.52 121.24,1415.52 ccw(c121.24,1417.01) 122.29,1415.95 134.04,1415.95 ccw(c134.04,1419.04) J2.A7@136.23,1416.86 ; J2.B7@204.34,1397.17 216.46,1398.08 233.2,1398.51 cw(c233.47,1388.52) 233.47,1398.52 303.4,1398.52 cw(c303.4,1388.52) 310.47,1395.59 311.38,1394.68 cw(c304.31,1387.61) 314.31,1387.63 314.31,1375.07 314.31,1339.1 ccw(c345.41,1339.1) 345.41,1308 370.93,1308 cw(c370.93,1290.93) 383,1303 383.71,1302.3 ccw(c390,1308.59) v1(390,1299.69)
  Bottom Layer w10: U4.3@328.71,1443.83 325.71,1440.83 280.11,1440.83 254.8,1415.52 103.51,1415.52 cw(c103.51,1429.7) 93.48,1419.67 91.93,1421.22 ccw(c85.64,1414.93) v1(85.64,1423.83) ccw(c85.64,1414.93) 79.34,1421.22 cw(c65.57,1434.99) 65.57,1415.52 59.19,1415.52 ccw(c59.19,1384.33) 28,1384.33 28,1104.9 ccw(c74.03,1104.9) 74.03,1058.87 274.15,1058.87 ccw(c274.15,1106.71) 322,1106.71 322,1295.81 cw(c335.1,1295.81) 335.1,1308.91 367.74,1308.91 cw(c367.74,1286.32) 383.71,1302.3 ccw(c390,1308.59) v1(390,1299.69)
TYPEC_D_P: J2.A6 J2.B6 U4.1 | length 1543.7
  Top Layer w10: v1(85.64,1390.2) ccw(c85.64,1399.1) 91.93,1392.81 93.48,1394.36 cw(c103.51,1384.33) 103.51,1398.52 121.24,1398.52 cw(c121.24,1397.03) 122.29,1398.08 134.04,1398.08 cw(c134.04,1394.99) J2.A6@136.23,1397.17 ; J2.B6@204.34,1416.86 216.46,1415.95 233.25,1415.52 ccw(c233.47,1425.52) 233.47,1415.52 303.4,1415.52 cw(c303.4,1388.52) 322.49,1407.61 323.4,1406.7 cw(c304.31,1387.61) 331.31,1387.67 cw(c314.31,1387.61) 331.31,1387.61 331.31,1339.1 ccw(c345.41,1339.1) 345.41,1325 370.93,1325 ccw(c370.93,1342.07) 383,1330 383.71,1330.7 cw(c390,1324.41) v1(390,1333.31)
  Bottom Layer w10: U4.1@328.71,1369.02 324.52,1373.21 278.26,1373.21 252.95,1398.52 224.83,1398.52 193.17,1398.52 ccw(c193.17,1388.52) 183.17,1388.52 183.17,1372.86 cw(c173.17,1372.86) 163.17,1372.86 163.17,1388.52 ccw(c153.17,1388.52) 153.17,1398.52 128.17,1398.52 103.51,1398.52 ccw(c103.51,1384.33) 93.48,1394.36 91.93,1392.81 cw(c85.64,1399.1) v1(85.64,1390.2) cw(c85.64,1399.1) 79.34,1392.81 77.44,1394.71 ccw(c68.26,1385.52) 68.26,1398.52 59.19,1398.52 ccw(c59.19,1384.33) 45,1384.33 45,1104.9 ccw(c74.03,1104.9) 74.03,1075.87 274.15,1075.87 ccw(c274.15,1106.71) 305,1106.71 305,1295.81 cw(c335.1,1295.81) 335.1,1325.91 372.13,1325.91 ccw(c372.13,1342.28) 383.71,1330.7 cw(c390,1324.41) v1(390,1333.31)
TYPEC_N: U4.4 U8.13 | length 3617.9
  Top Layer w11: v1(3168.6,1957.9) ccw(c3153.36,1973.14) 3174.91,1973.14 3174.91,2045.95 3196.99,2068.03 3228.29,2068.03 ccw(c3228.29,2117.53) 3233.05,2068.26 ccw(c3228.29,2117.53) 3243.15,2070.31 ccw(c3228.29,2117.53) U8.13@3263.29,2082.53
  Bottom Layer w11: U4.4@431.86,1443.83 425.15,1450.53 411.29,1450.53 404.85,1456.97 404.85,1575 404.85,1601.5 cw(c415.85,1601.5) 415.85,1612.5 469.72,1612.5 ccw(c469.72,1623) 469.72,1633.5 415.85,1633.5 cw(c415.85,1644.5) 404.85,1644.5 404.85,1692.41 404.85,1864.75 533.59,1993.49 3162.3,1993.49 3174.91,1980.88 3174.91,1967.63 3168.6,1961.32 v1(3168.6,1957.9)
TYPEC_P: U4.6 U8.14 | length 3615.6
  Top Layer w11: v1(3202.22,1957.9) cw(c3217.46,1973.14) 3195.91,1973.14 3195.91,2037.25 3205.69,2047.03 3228.29,2047.03 cw(c3228.29,1997.52) 3233.05,2046.8 cw(c3228.29,1997.52) 3243.15,2044.74 cw(c3228.29,1997.52) U8.14@3263.29,2032.53
  Bottom Layer w11: U4.6@431.86,1369.02 431.63,1369.25 397.79,1369.25 383.85,1383.19 383.85,1604.79 383.85,1815 383.85,1873.44 524.89,2014.49 3171,2014.49 3195.91,1989.58 3195.91,1967.63 3202.22,1961.32 v1(3202.22,1957.9)
VBAT: C24.2 C43.2 C44.2 J8.2 L2.1 L3.2 R16.1 R48.2 U5.7 U12.2 U12.3
  other v1: 607.44,3887.63 645.72,3887.63 684,3887.63 1043.79,3887.63 607.44,3925 645.72,3925 684,3925 1043.79,3925 607.44,3962.37 645.72,3962.37 684,3962.37 1043.79,3962.37 607.44,3999.73 645.72,3999.73 684,3999.73 1043.79,3999.73
VBUS-TYPEC: C22.1 J2.A4 J2.A9 J2.B4 J2.B9 U4.5 U6.6 | length 45.9
  Bottom Layer w10: v1@481.3,1432.21 v1@484.59,1435.5
  Bottom Layer w15: v1@484.59,1435.5 C22.1@484.59,1476.73
  other v1: 136.23,1333.53 204.34,1333.53 484,1400.42 517.78,1400.42 483.94,1433.85 517.73,1433.85 136.23,1480.51 204.34,1480.51
VCC: C3.1 C4.2 C17.2 D1.2 J1.2 J13.1 J13.2 J13.3 Q1.1 Q1.2 Q1.3 R6.1 U2.6
  other v1: 6091.92,4073.64 6124.28,4073.64 6091.92,4106.93 6124.28,4106.93 6091.92,4140.21 6124.28,4140.21
VDD: C47.2 C48.1 FB2.2 FB3.1 J21.9 J21.11 R96.1 R98.1 RN1.1 RN1.2 RN1.3 U22.28 | length 893.9
  Top Layer w10: C48.1@3665.29,2954.28 3665.29,2957.78 C48.1@3671.59,2964.08
  Top Layer w15: R96.1@3850.24,2845.78 v1(3939,2845.78) ; RN1.1@4095.26,3256.1 RN1.2@4095.26,3289.17 ; v1(4128.27,3289.17) RN1.2@4095.26,3289.17 ; v1(4128.27,3320.67) RN1.3@4095.26,3320.67 RN1.2@4095.26,3289.17
  Top Layer w25: v1(3325,3303.24) FB3.1@3385.44,3303.24
  Layer 2 w20: J21.11@3540.49,4247.94 3540.49,4315.49 3560,4335 3971.71,4335 3990.49,4316.22 J21.9@3990.49,4247.94
  other v1: 3508.89,2995 3508.89,3057.97
VDD_POE: C70.2 D46.1 D47.1 FB4.1 | length 567.6
  Top Layer w25: v1(4074.83,3781.45) D46.1@4023.99,3781.45 4024.81,3780.62 4024.81,3728.5 4042.31,3711 C70.2@4121.47,3711 FB4.1@4121.47,3662.63 ; D47.1@4293.99,3781.45 v1(4340,3781.45)
  Layer 2 w25: v1(4074.83,3781.45) v1(4340,3781.45)
  other v1: 4111.47,3781.45
VDDA: C49.1 C50.1 C51.1 C52.1 C53.1 C54.2 FB3.2 R89.2 R97.2 R99.2 U22.4 U22.8 U22.11 U22.15 U22.17 U22.21 | length 844.9
  Top Layer w10: C54.2@3469.81,3237.1 ccw(c3476.1,3237.1) C54.2@3476.1,3230.8 ; v1(3501.52,3230.31) 3501.77,3230.56 3553.24,3230.56 U22.17@3553.48,3230.8 ; U22.21@3553.48,3152.06 v1(3604.05,3152.06) ; U22.15@3553.48,3270.17 v1(3632.22,3270.17) ; v1(3632.22,3318.03) U22.11@3632.22,3368.6 ; v1@3691.28,3318.03 U22.8@3691.28,3368.6 ; v1@3770.02,3318.03 U22.4@3770.02,3368.6
  Top Layer w20: C54.2@3476.1,3230.8 v1@3501.52,3230.8 ; R97.2@3545.4,3549.47 R99.2@3645.61,3549.46
  Top Layer w25: FB3.2@3464.18,3303.24 3469.81,3297.61 C54.2@3469.81,3237.1 ; v1(3464.18,3353.96) 3464.18,3308.87 FB3.2@3467.31,3305.74
  Bottom Layer w10: C50.1@3568,3270.17 v1(3632.22,3270.17) ; R89.2@3644.47,3549.47 R89.2@3645,3550
  Bottom Layer w15: C49.1@3568,3152.06 v1(3604.05,3152.06) ; v1(3595.13,3549.47) R89.2@3644.47,3549.47 ; v1(3632.22,3318.03) C53.1@3632.22,3353.96 ; v1(3696.28,3318.03) C52.1@3696.28,3353.96 ; v1(3765.02,3318.03) C51.1@3765.02,3353.96
VIN: C2.1 C5.2 C6.2 C7.2 F1.1 Q1.5 U2.4
  other v1: 5950,3679.34 5950,3714.63 5989.07,3714.63
VSS_POE: C70.1 D46.2 D47.2 FB5.1
W5500_INT: R96.2 U9.15 U22.36 | length 3126.6
  Top Layer w10: v1(2925,1865) 2925,2022.73 2940.72,2038.44 U9.15@2997.73,2038.44 ; U22.36@3829.17,3016.49 3829.17,3016.14 3830.37,3014.94 3830.72,3014.94 3850.14,2995.52 v1(3850.14,2925.48) R96.2@3850.14,2882.88
  Layer 2 w10: v1(2925,1865) v1(4250,1865)
  Bottom Layer w10: v1(3850.14,2925.48) 3850.14,2634.26 3871.39,2613 4206,2613 4250,2569 v1(4250,1865)
W5500_RST: R98.2 U9.16 U22.37 | length 3323.1
  Top Layer w10: v1(2895,1840) 2895,2024.58 2934.45,2064.03 U9.16@2997.73,2064.03 ; R98.2@3897.48,2882.78 v1(3897.48,2925.48) U22.37@3897.48,3091.81
  Layer 2 w10: v1(2895,1840) v1(4282,1840)
  Bottom Layer w10: v1(3897.48,2925.48) 3897.48,2664.9 3916.94,2645.44 4221.88,2645.44 4282,2585.32 v1(4282,1840)
pads on no net: J2.A8 J2.B8 J2.MH J3.MP1 J3.MP2 J8. J21.MH J21.MH1 LED5.2 RN1.4 RN1.5 RN2.1 RN2.2 RN2.7 RN2.8 SW1.3 SW1.6 SW1.7 SW1.8 T1.4 T1.5 T1.12 T1.13 U1.16 U6.8 U7.8 U8.15 U8.16 U8.26 U8.28 U8.29 U8.30 U9.18 U9.19 U9.20 U10.7 U22.7 U22.12 U22.13 U22.18 U22.24 U22.26 U22.46 U22.47 X1.2 X1.3

## Polygon pours and split planes (outlines as drawn)
GND on Layer 1 "Layer 1-GND" (solid, remove dead copper, pour order 107): 1220,1081 cw(c1320,1081) 1320,1181 4034.52,1181 cw(c4034.52,1081) 4134.52,1081 4135,965 4135,0 6299.21,0 6299.21,4724.41 0,4724.41 0,0 1018.63,0 1030.33,1.74 1220,-1.94
NetC59_2 on Layer 1 "NETC59_2_L02_P055" (solid, pour order 55): 3457.18,4528.6 3470.41,4515.37 3470.41,4402.32 3487.72,4385 3943.85,4385 3970.41,4411.56 3970.41,4507.39 3993.02,4530 4100,4530 4120,4510 4120,4360 4095,4335 3350,4335 3325,4360 3325,4509.48 3344.12,4528.6
GND on Top Layer "Layer 1-GND" (solid, remove dead copper, pour order 102): 1220,1181 4135,1181 4135,0 6299.21,0 6299.21,4724.41 0,4724.41 0,0 1018.63,0 1030.33,1.74 1220,-1.94
5V-OR on Top Layer "5V-OR_L01_P101" (solid, pour order 101): 573.31,2510 533.31,2470 533.31,1448.58 569.36,1412.52 775.07,1412.52 810,1447.45 810,2470 770,2510
GND on Top Layer "GND_L01_P031" (solid, pour order 31): 5070.35,672.53 5070.35,803.7 5085.46,818.81 5259.35,818.81 5270.35,807.81 5270.35,670.81 5258.35,658.81 5084.08,658.81
RLY4_COM on Top Layer "RLY4_COM_L01_P077" (solid, pour order 77): 3554.96,94.29 ccw(c3554.96,148.91) 3609.59,148.92 3609.59,262.08 cw(c3670.95,262.08) 3670.95,323.45 3834,323.45 ccw(c3834,384.1) 3894.65,384.1 3894.65,625 ccw(c3829.65,625) 3829.65,690 3398.61,690 ccw(c3398.61,621.04) 3329.65,621.04 3329.65,155 ccw(c3389.65,155) 3389.65,95 3390.36,94.29
RLY3_COM on Top Layer "RLY3_COM_L01_P075" (solid, pour order 75): 2930.82,94.29 ccw(c2930.82,148.91) 2985.44,148.92 2985.44,262.08 cw(c3046.8,262.08) 3046.8,323.45 3209.85,323.45 ccw(c3209.85,384.1) 3270.5,384.1 3270.5,625 ccw(c3205.51,625) 3205.5,690 2774.47,690 ccw(c2774.46,621.04) 2705.5,621.04 2705.5,155 ccw(c2765.5,155) 2765.5,95 2766.21,94.29
RLY2_COM on Top Layer "RLY2_COM_L01_P073" (solid, pour order 73): 2306.67,94.29 ccw(c2306.67,148.91) 2361.29,148.92 2361.29,262.08 cw(c2422.66,262.08) 2422.66,323.45 2585.7,323.45 ccw(c2585.7,384.1) 2646.36,384.1 2646.36,625 ccw(c2581.36,625) 2581.36,690 2150.32,690 ccw(c2150.32,621.04) 2081.36,621.04 2081.36,155 ccw(c2141.36,155) 2141.36,95 2142.06,94.29
RLY1_COM on Top Layer "RLY1_COM_L01_P064" (solid, pour order 64): 1685.31,94.29 ccw(c1685.31,148.91) 1739.93,148.92 1739.93,262.08 cw(c1801.3,262.08) 1801.3,323.45 1964.34,323.45 ccw(c1964.34,384.1) 2025,384.1 2025,625 ccw(c1960,625) 1960,690 1528.96,690 ccw(c1528.96,621.04) 1460,621.04 1460,155 ccw(c1520,155) 1520,95 1520.71,94.29
NetC67_2 on Top Layer "NETC67_2_L01_P063" (solid, pour order 63): 4690.75,3313.79 4710,3294.54 4710,3132 4690,3112 4503.08,3112 4482.73,3132.35 4482.73,3291.05 4505.46,3313.79
VSS_POE on Top Layer "VSS_POE_L01_P053" (solid, pour order 53): 4410,3766 4419,3757 4464.42,3757 4471.15,3763.73 4471.15,3840.33 4461.66,3849.82 4175.63,3849.82 4161.78,3835.97 4161.78,3647.31 4222,3647.31 4222,3810.53 4231.47,3820 4401.42,3820 4410,3811.42
VDD_POE on Top Layer "VDD_POE_L01_P052" (solid, pour order 52): 4005.06,3799.16 3993,3787.1 3993,3658.11 4003.81,3647.31 4137.22,3647.31 4137.22,3787.15 4125.2,3799.16
NetC71_2 on Top Layer "NETC71_2_L01_P046" (solid, pour order 46): 4003.59,3615.81 3993,3605.22 3993,3527.54 4003.15,3517.38 4128.27,3517.38 4137.22,3526.33 4137.22,3615.81
NetC71_1 on Top Layer "NETC71_1_L01_P042" (solid, pour order 42): 4161.78,3615.81 4161.78,3443.61 4178.05,3427.34 4327.94,3427.34 4346.11,3445.51 4346.11,3597.64 4327.94,3615.81
NetC66_1 on Top Layer "NETC66_1_L01_P039" (solid, pour order 39): 4717.53,4126.01 4717.53,3838.12 4734.03,3821.62 4867.85,3821.62 4884.42,3805.06 4884.42,3738.96 4902.46,3720.92 5042.95,3720.92 5060,3737.96 5060,4124.61 5034.61,4150 4741.52,4150
VBAT on Top Layer "VBAT_L01_P035" (solid, pour order 35): 616.84,4090.84 589,4063 589,3809 625.94,3772.06 1033.06,3772.06 1069,3808 1069,4071.51 1049.68,4090.84
GND on Top Layer "GND_L01_P033" (solid, pour order 33): 2554.63,3298.64 2710.37,3298.64 2725,3284.02 2725,3115 2708.64,3098.64 2556.36,3098.64 2539.95,3115.05 2539.95,3283.96
GND on Top Layer "GND_L01_P022" (solid, pour order 22): 6096.06,2614.06 5964.89,2614.06 5949.78,2629.16 5949.78,2803.06 5960.78,2814.06 6097.78,2814.06 6109.78,2802.06 6109.78,2627.78
GND on Top Layer "GND_L01_P020" (solid, pour order 20): 5491.36,3137.85 5505.77,3152.26 5668.88,3152.26 5685,3136.14 5685,2961.93 5668.07,2945 5505.71,2945 5491.36,2959.35
NetF2_1 on Top Layer "NETF2_1_L01_P018" (solid, pour order 18): 5452.05,3012.7 5465.57,3026.22 5465.57,3139.31 5449.88,3155 5169.81,3155 5155.83,3141.02 5155.83,3026.54 5169.67,3012.7 5315.64,3012.7
24V on Top Layer "24V_L01_P013" (solid, pour order 13): 5963.72,3163 6094.9,3163 6110,3147.9 6110,2974 6099,2963 5962,2963 5950,2975 5950,3149.28
NetC73_1 on Top Layer "NETC73_1_L01_P007" (solid, pour order 7): 5625.26,3940 5605,3919.74 5605,3741.18 5584.74,3720.92 5324.61,3720.92 5300,3745.53 5300,4123.41 5326.59,4150 5720,4150 5745,4125 5745,3960 5725,3940
VCC on Top Layer "VCC_L01_P001" (solid, pour order 1): 6139.56,3979.47 6158.38,3998.29 6158.38,4555.85 6052.75,4661.48 5078.36,4661.48 5046.94,4630.07 5046.94,4413.14 5090.09,4370 5820,4370 5840,4350 5840,3999.07 5859.6,3979.47
NetF6_2 on Bottom Layer "NETF6_2_L04_P029" (solid, pour order 29): 4488.48,307.46 4459.56,336.38 4176.81,336.38 4147.94,307.51 4147.94,160.87 4176.81,132 4459.95,132 4488.48,160.53
GND on Bottom Layer "Layer 1-GND" (solid, remove dead copper, pour order 108): 1220,1081 cw(c1320,1081) 1320,1181 4034.52,1181 cw(c4034.52,1081) 4134.52,1081 4135,965 4135,0 6299.21,0 6299.21,4724.41 0,4724.41 0,0 1018.63,0 1030.33,1.74 1220,-1.94
5V on Bottom Layer "5V_L04_P025" (solid, pour order 25): 5135.25,527.47 5149,541.22 5149,732.26 5132.05,749.21 4801.02,749.21 4780,728.19 4780,542.47 4795,527.47
RLY4_NO on Bottom Layer "RLY4_NO_L04_P078" (solid, pour order 78): 3609.59,164.88 ccw(c3680.17,164.88) 3680.17,94.29 3828.95,94.29 ccw(c3828.95,160) 3894.65,160 3894.65,775.88 ccw(c3810.54,775.89) 3810.53,860 3399.77,860 ccw(c3399.77,789.88) 3329.65,789.88 3329.65,375 ccw(c3411.83,375) 3411.83,292.82 3537.18,292.82 cw(c3537.18,220.42) 3609.59,220.42
RLY3_NO on Bottom Layer "RLY3_NO_L04_P076" (solid, pour order 76): 2985.44,164.88 ccw(c3056.02,164.88) 3056.03,94.29 3204.8,94.29 ccw(c3204.8,160) 3270.5,160 3270.5,775.88 ccw(c3186.39,775.89) 3186.38,860 2775.62,860 ccw(c2775.62,789.88) 2705.5,789.88 2705.5,375 ccw(c2787.68,375) 2787.68,292.82 2913.03,292.82 cw(c2913.03,220.42) 2985.44,220.42
RLY2_NO on Bottom Layer "RLY2_NO_L04_P074" (solid, pour order 74): 2361.29,164.88 ccw(c2431.88,164.88) 2431.88,94.29 2580.65,94.29 ccw(c2580.65,160) 2646.36,160 2646.36,775.88 ccw(c2562.24,775.89) 2562.24,860 2151.48,860 ccw(c2151.47,789.88) 2081.36,789.88 2081.36,375 ccw(c2163.53,375) 2163.54,292.82 2288.88,292.82 cw(c2288.89,220.42) 2361.29,220.42
RLY1_NO on Bottom Layer "RLY1_NO_L04_P068" (solid, pour order 68): 1739.93,164.88 ccw(c1810.52,164.88) 1810.52,94.29 1959.29,94.29 ccw(c1959.29,160) 2025,160 2025,775.88 ccw(c1940.89,775.89) 1940.88,860 1530.12,860 ccw(c1530.12,789.88) 1460,789.88 1460,375 ccw(c1542.18,375) 1542.18,292.82 1667.53,292.82 cw(c1667.53,220.42) 1739.93,220.42
24V-POE on Bottom Layer "24V-POE_L04_P060" (solid, pour order 60): 5270,3604.04 5270,3103.78 5290,3083.78 5549.64,3083.78 5573.74,3107.88 5573.74,3381.3 5552.19,3402.85 5465.12,3402.85 5445.13,3422.83 5445.13,3604.04
NetC71_1 on Bottom Layer "NETC71_1_L04_P041" (solid, pour order 41): 4153.78,3042.82 4166.6,3030 4279,3030 4292,3043 4292,3221.5 4234.45,3221.5 4219.73,3236.22 4219.73,3413.52 4233.55,3427.34 4327.94,3427.34 4327.94,3517.38 4169.97,3517.38 4153.78,3501.2
NetC59_2 on Bottom Layer "NETC59_2_L04_P054" (solid, pour order 54): 3387.73,4324.14 3230.31,4324.14 3215.31,4339.14 3215.31,4512.84 3231.07,4528.6 3457.18,4528.6 3470.41,4515.37 3470.41,4338.08 3456.47,4324.14 3230,4324.14
NetR112_1 on Bottom Layer "NETR112_1_L04_P051" (solid, pour order 51): 4346.11,3757 4329.9,3773.21 4233.21,3773.21 4219.73,3759.73 4219.73,3548.15 4153.78,3548.15 4153.78,3834.74 4168.86,3849.82 4453.4,3849.82 4467.73,3835.49 4467.73,3548.15 4346.11,3548.15
NetC67_2 on Bottom Layer "NETC67_2_L04_P045" (solid, pour order 45): 4412.73,3370 4671.66,3370 4691.66,3350 4691.66,3244.66 4668.5,3221.5 4522.51,3221.5 4502.73,3241.28 4502.73,3301.09 4482.73,3321.09 4412.73,3321.09
NetC71_2 on Bottom Layer "NETC71_2_L04_P044" (solid, pour order 44): 4346.11,3396.58 4392.01,3396.58 4392.01,3301.28 4402,3291.28 4464.69,3291.28 4470.67,3285.3 4470.67,3043.76 4456.91,3030 4335.21,3030 4322,3043.21 4322,3221.5 4346.11,3245.61
NetL3_1 on Bottom Layer "NETL3_1_L04_P038" (solid, pour order 38): 803.15,3569 795.2,3561.05 795.2,3518.62 735.94,3518.62 735.94,3679.01 746.93,3690 901.11,3690 912.16,3678.95 912.16,3580.47 900.69,3569
NetF5_2 on Bottom Layer "NETF5_2_L04_P028" (solid, pour order 28): 5046.07,490.54 5014.1,458.58 5014.1,153.79 5037.89,130 5323.6,130 5350,156.4 5350,470 5329.46,490.54
3V3 on Bottom Layer "3V3_L04_P027" (solid, pour order 27): 4386.54,496.38 4398.17,508.01 4541.66,508.01 4553.3,496.38 4553.3,382.89 4541.41,371 4399.16,371 4386.53,383.62
NetC19_2 on Bottom Layer "NETC19_2_L04_P026" (solid, pour order 26): 4704.45,528.02 4402.14,528.02 4386.54,543.62 4386.54,737 4399.54,750 4708.7,750 4720,738.7 4720,543.57
NetC73_1 on Bottom Layer "NETC73_1_L04_P008" (solid, pour order 8): 5319.15,3656.92 5319.15,3839.88 5333.24,3853.98 5727.02,3853.98 5741,3840 5741,3656.92
5V-OR on Layer 2 "5V-OR_L03_P094" (solid, pour order 94): 550,2410 610,2350 1079.35,2350 1150,2420.65 1150,3670 1111.51,3708.49 590.08,3708.49 550,3668.4
3V3 on Layer 2 "Layer 1-GND" (solid, remove dead copper, pour order 109): 1220,1081 cw(c1320,1081) 1320,1181 4034.52,1181 cw(c4034.52,1081) 4134.52,1081 4135,965 4135,0 6299.21,0 6299.21,4724.41 0,4724.41 0,0 1018.63,0 1030.33,1.74 1220,-1.94
5V-PWR on Layer 2 "5V-PWR_L03_P093" (solid, pour order 93): 4849.01,1543.01 4915.73,1609.73 4915.73,1899.27 4915.73,3070.01 4965.72,3120 5601.57,3120 5652.63,3068.94 5652.63,1252.63 5580,1180 465.84,1180 440,1205.84 440,1512.49 470.51,1543.01
5V-BOOST on Layer 2 "5V-BOOST_L03_P097" (solid, pour order 97): 521.4,2411.4 521.4,3668.33 481.24,3708.49 67.84,3708.49 25,3665.65 25,2417.21 92.21,2350 460,2350
VDD on Layer 2 "VDD_L03_P090" (solid, pour order 90): 3246,2863.23 3287.23,2822 4140.19,2822 4174.65,2856.46 4174.65,3342.35 4139,3378 3870.87,3378 3845,3352.13 3845,3155.67 3802.74,3113.41 3426.47,3113.41 3390.81,3149.08 3390.81,4133.81 3428.85,4171.85 4018.02,4171.85 4045.49,4199.32 4045.49,4341.06 4017.55,4369 3283.23,4369 3246,4331.77
VDDA on Layer 2 "VDDA_L03_P057" (solid, pour order 57): 3781.03,3578.97 3815.69,3544.31 3815.69,3164.56 3786.13,3135 3452.06,3135 3419.38,3167.69 3419.38,3544.38 3453.97,3578.97
NetC71_2 on Layer 2 "NETC71_2_L03_P047" (solid, pour order 47): 4336.04,3527.96 4357,3507 4357,3163.04 4371.04,3149 4450,3149 4462.73,3161.73 4462.73,3604.27 4434,3633 4010,3633 3993,3616 3993,3538 4003.04,3527.96
NetC67_2 on Layer 2 "NETC67_2_L03_P049" (solid, pour order 49): 4581.25,3930 4606.94,3904.31 4606.94,3399.06 4623,3383 4697,3383 4710,3370 4710,3215 4695,3200 4507.73,3200 4482.73,3225 4482.73,3621.06 4445.6,3658.19 4445.6,3900.6 4475,3930